# Altium PCB Microphone Breakout Board.PcbDoc (part 2 of 2)
Units mm, origin at the board's own origin, x right, y up, seen from the top; angles counter-clockwise.
Board outline 50 x 68.07 mm, 2 copper layers (Top Layer, Bottom Layer), stack 1.448 mm thick; 111 components, 81 nets, 324 pads, 44 vias.
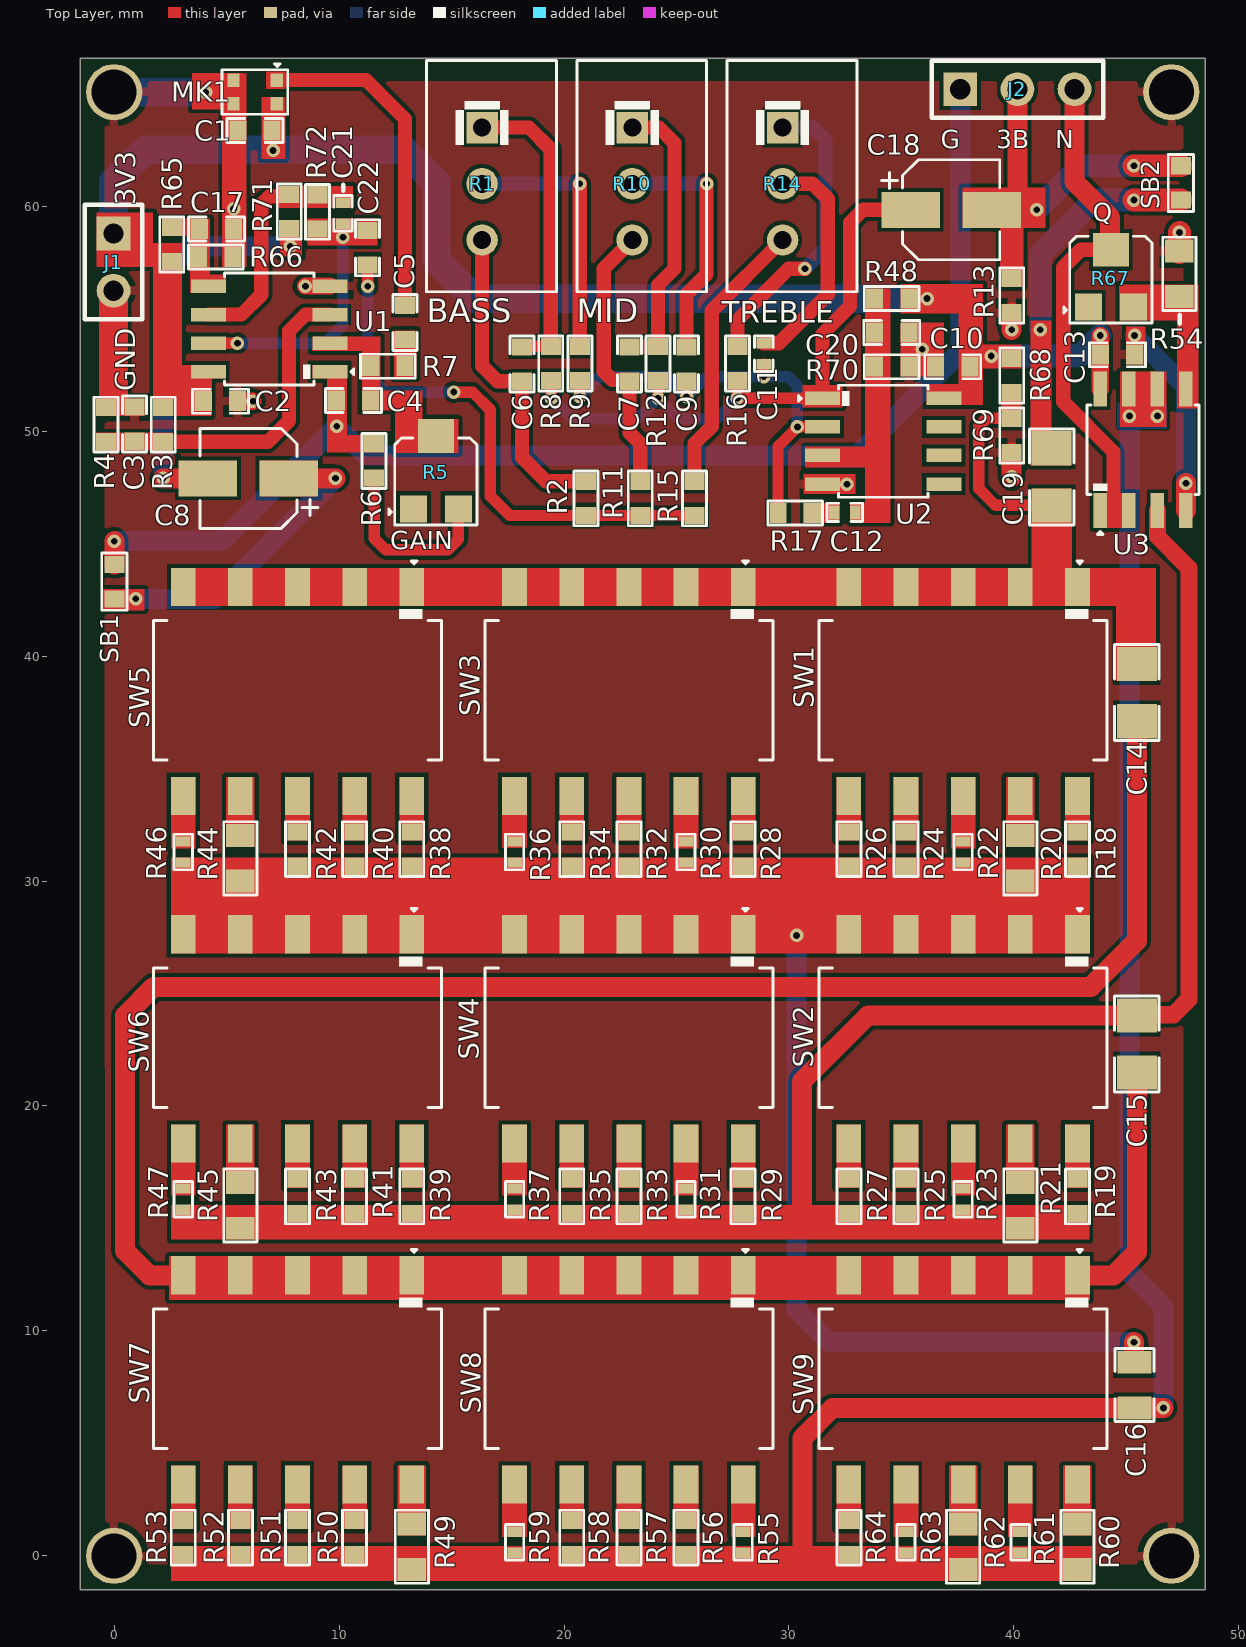
[diagram p0: Top Layer view]

## Part data (continued)
R40 R41: library part RT0603BRD071K1L, "RES SMD 1.1K OHM 0.1% 1/10W 0603", Case Code (Imperial)=0603, Case Code (Metric)=1608, LCSC Part Number=C705736, Manufacturer=Yageo, Max Operating Temperature=125°C, Max Power Dissipation=100mW, Min Operating Temperature=-55°C, Package Quantity=5000, Resistance=1.1kR, Resistor Type="Thin Film", Supplier Part Number 1=1991436, Temperature Coefficient=25ppm/°C, Tolerance=0.1%, Voltage Rating=75V, Voltage Rating (DC)=50V, Case/Package=0603, Category="Chip SMD Resistors", ComponentLink1Description=https://datasheet.ciiva.com/12725/pyu-rt-1-to-0-05-rohs-l-4-12725819.pdf?src-supplier=Mouser, ComponentLink1URL=https://datasheet.ciiva.com/12725/pyu-rt-1-to-0-05-rohs-l-4-12725819.pdf?src-supplier=Mouser, ComponentLink2Description=https://datasheet.ciiva.com/2585/pyu-rt-1-to-0-05-rohs-l-4-2585740.pdf?src-supplier=Digi-Key, ComponentLink2URL=https://datasheet.ciiva.com/2585/pyu-rt-1-to-0-05-rohs-l-4-2585740.pdf?src-supplier=Digi-Key, ComponentLink3Description=https://datasheet.ciiva.com/8895/pyu-rt-1-to-0-05-rohs-l-4-8895949.pdf?src-supplier=Avnet, ComponentLink3URL=https://datasheet.ciiva.com/8895/pyu-rt-1-to-0-05-rohs-l-4-8895949.pdf?src-supplier=Avnet, Contact Plating=Tin,Matte, Features="Moisture Resistant", Height=0.022inch, Item Type=Resistor, Lead Free="Lead Free", Length=0.063inch, Manufacturer Part Number=RT0603BRD071K1L, Number of Terminations=2, Packaging="Tape and Reel", Power Rating=100mW, Pricing 1="10=0.23500, 100=0.21900, 250=0.20400, 500=0.19000, 1000=0.17400 (GBP)", Radiation Hardening=No, RoHS=Yes, RoHS Compliant=Yes, Series=RT, Stock 1=7030, Supplier 1=Rs, Termination=SMD/SMT, Width=0.031inch
R44 R45: library part ARG05BTC9000N, "125mW Thin Film Resistor 150V ±25ppm/℃ ±0.1% -55℃~+155℃ 900Ω 0805 Chip Resistor - Surface Mount ROHS", LCSC Part Number=C2828704, Manufacturer="Viking Tech", ComponentLink1Description=LCSC, ComponentLink1URL=https://www.lcsc.com/product-detail/Chip-Resistor-Surface-Mount_Viking-Tech-ARG05BTC9000N_C2828704.html, Item Type=Resistor, Manufacturer Part Number=ARG05BTC9000N
R46 R47 R59: library part RT0402BRD07806RL, "RES SMD 806 OHM 0.1% 1/16W 0402", Case Code (Imperial)=0402, Case Code (Metric)=1005, LCSC Part Number=C852922, Manufacturer=Yageo, Max Operating Temperature=155°C, Max Power Dissipation=63mW, Min Operating Temperature=-55°C, Package Quantity=10000, Power Rating=62.5mW, Resistor Type="Thin Film", Temperature Coefficient=25ppm/°C, Tolerance=0.1%, Voltage Rating=50V, Case/Package=0402, Category="Chip SMD Resistors", ComponentLink1Description=https://datasheet.ciiva.com/2582/pyu-rt-1-to-0-05-rohs-l-4-2582500.pdf?src-supplier=Digi-Key, ComponentLink1URL=https://datasheet.ciiva.com/2582/pyu-rt-1-to-0-05-rohs-l-4-2582500.pdf?src-supplier=Digi-Key, ComponentLink2Description=https://datasheet.ciiva.com/46635/pyu-rt-1-to-0-05-rohs-l-5-46635068.pdf?src-supplier=Digi-Key, ComponentLink2URL=https://datasheet.ciiva.com/46635/pyu-rt-1-to-0-05-rohs-l-5-46635068.pdf?src-supplier=Digi-Key, Features="Moisture Resistant", Height=0.014inch, Item Type=Resistor, Lead Free="Lead Free", Length=0.039inch, Manufacturer Part Number=RT0402BRD07806RL, Number of Terminations=2, Packaging="Tape and Reel", Pricing 1="1=0.32050, 10=0.28580, 25=0.25690, 100=0.10950 (USD)", Resistance=806R, RoHS=Yes, RoHS Compliant=Yes, Series=RT, Stock 1=104, Supplier 1="Arrow Electronics", Supplier Part Number 1=RT0402BRD07806RL, Termination=SMD/SMT, Voltage Rating (DC)=50V, Width=0.02inch
R51: library part RT0603BRD0713K3L, "RES SMD 13.3KOHM 0.1% 1/10W 0603", Case Code (Imperial)=0603, Case Code (Metric)=1608, LCSC Part Number=C861117, Manufacturer=Yageo, Max Operating Temperature=125°C, Max Power Dissipation=100mW, Min Operating Temperature=-55°C, Package Quantity=5000, Resistance=13.3kR, Resistor Type="Thin Film", Temperature Coefficient=25ppm/°C, Tolerance=0.1%, Voltage Rating=75V, Voltage Rating (DC)=50V, Case/Package=0603, Category="Chip SMD Resistors", ComponentLink1Description=https://datasheet.ciiva.com/12725/pyu-rt-1-to-0-05-rohs-l-4-12725067.pdf?src-supplier=Mouser, ComponentLink1URL=https://datasheet.ciiva.com/12725/pyu-rt-1-to-0-05-rohs-l-4-12725067.pdf?src-supplier=Mouser, ComponentLink2Description=https://datasheet.ciiva.com/8890/pyu-rt-1-to-0-05-rohs-l-4-8890934.pdf?src-supplier=Avnet, ComponentLink2URL=https://datasheet.ciiva.com/8890/pyu-rt-1-to-0-05-rohs-l-4-8890934.pdf?src-supplier=Avnet, ComponentLink3Description=https://datasheet.ciiva.com/2585/pyu-rt-1-to-0-05-rohs-l-4-2585661.pdf?src-supplier=Digi-Key, ComponentLink3URL=https://datasheet.ciiva.com/2585/pyu-rt-1-to-0-05-rohs-l-4-2585661.pdf?src-supplier=Digi-Key, ComponentLink4Description=https://datasheet.ciiva.com/46635/pyu-rt-1-to-0-05-rohs-l-5-46635007.pdf?src-supplier=Digi-Key, ComponentLink4URL=https://datasheet.ciiva.com/46635/pyu-rt-1-to-0-05-rohs-l-5-46635007.pdf?src-supplier=Digi-Key, Construction=Rectangular, Contact Plating=Tin,Matte, Depth=0.8mm, Features="Moisture Resistant", Height=0.022inch, Item Type=Resistor, Lead Free="Lead Free", Length=0.063inch, Manufacturer Part Number=RT0603BRD0713K3L, Military Standard=Not, Number of Terminations=2, Packaging="Tape and Reel", Power Rating=100mW, Pricing 1="1=0.29220, 10=0.24060, 25=0.23820, 100=0.10400, 250=0.10250, 500=0.10060, 1000=0.06040, 3000=0.04000 (USD)", Radiation Hardening=No, RoHS=Yes, RoHS Compliant=Yes, Series=RT, Stock 1=4750, Supplier 1="Arrow Electronics", Supplier Part Number 1=RT0603BRD0713K3L, Termination=SMD/SMT, Width=0.031inch
R54: library part FRC0805F9802TS, "125mW Thick Film Resistors 150V ±100ppm/℃ ±1% -55℃~+155℃ 98kΩ 0805 Chip Resistor - Surface Mount ROHS", LCSC Part Number=C2933514, Manufacturer=FOJAN, ComponentLink1Description=LCSC, ComponentLink1URL=https://www.lcsc.com/product-detail/Chip-Resistor-Surface-Mount_FOJAN-FRC0805F9802TS_C2933514.html, Item Type=Resistor, Manufacturer Part Number=FRC0805F9802TS
R60: library part RT0805BRD07649RL, "RES SMD 649 OHM 0.1% 1/8W 0805", Case Code (Imperial)=0805, Case Code (Metric)=2012, LCSC Part Number=C865602, Manufacturer=Yageo, Max Operating Temperature=125°C, Max Power Dissipation=125mW, Min Operating Temperature=-55°C, Package Quantity=5000, Resistor Type="Thin Film", Supplier Part Number 1=YAG4930CT-ND, Temperature Coefficient=25ppm/°C, Tolerance=0.1%, Voltage Rating=150V, Case/Package=0805, Category="Chip SMD Resistors", ComponentLink1Description=https://datasheet.ciiva.com/2585/pyu-rt-1-to-0-05-rohs-l-5-2585132.pdf?src-supplier=Digi-Key, ComponentLink1URL=https://datasheet.ciiva.com/2585/pyu-rt-1-to-0-05-rohs-l-5-2585132.pdf?src-supplier=Digi-Key, ComponentLink2Description=https://datasheet.ciiva.com/12704/pyu-rt-1-to-0-05-rohs-l-4-12704493.pdf?src-supplier=Mouser, ComponentLink2URL=https://datasheet.ciiva.com/12704/pyu-rt-1-to-0-05-rohs-l-4-12704493.pdf?src-supplier=Mouser, Contact Plating=Tin,Matte, Height=0.024inch, Item Type=Resistor, Lead Free="Lead Free", Length=0.079inch, Manufacturer Part Number=RT0805BRD07649RL, Number of Terminations=2, Packaging="Tape and Reel", Power Rating=125mW, Pricing 1="1=0.38000, 10=0.27200, 100=0.10870, 500=0.07404, 1000=0.05357, 2500=0.04963 (USD)", Radiation Hardening=No, Resistance=649R, RoHS=Yes, RoHS Compliant=Yes, Series=RT, Stock 1=6872, Supplier 1=Digi-Key, Termination=SMD/SMT, Voltage Rating (DC)=150V, Width=0.049inch
R61: library part ARG02BTC5490, "62.5mW Thin Film Resistor 50V ±25ppm/℃ ±0.1% -55℃~+155℃ 549Ω 0402 Chip Resistor - Surface Mount ROHS", LCSC Part Number=C2684524, Manufacturer="Viking Tech", ComponentLink1Description=LCSC, ComponentLink1URL=https://www.lcsc.com/product-detail/Chip-Resistor-Surface-Mount_Viking-Tech-ARG02BTC5490_C2684524.html, Item Type=Resistor, Manufacturer Part Number=ARG02BTC5490
R62: library part ARG05BTC5000, "125mW Thin Film Resistor 150V ±25ppm/℃ ±0.1% -55℃~+155℃ 500Ω 0805 Chip Resistor - Surface Mount ROHS", LCSC Part Number=C2828711, Manufacturer="Viking Tech", ComponentLink1Description=LCSC, ComponentLink1URL=https://www.lcsc.com/product-detail/Chip-Resistor-Surface-Mount_Viking-Tech-ARG05BTC5000_C2828711.html, Item Type=Resistor, Manufacturer Part Number=ARG05BTC5000
R63: library part RT0402BRD07453RL, "RES SMD 453 OHM 0.1% 1/16W 0402", Case Code (Imperial)=0402, Case Code (Metric)=1005, LCSC Part Number=C852794, Manufacturer=Yageo, Max Operating Temperature=125°C, Min Operating Temperature=-55°C, Power Rating=62.5mW, Supplier Part Number 1=YAG4266CT-ND, Temperature Coefficient=25ppm/°C, Tolerance=0.1%, Voltage Rating=50V, Case/Package=0402, Category="Chip SMD Resistors", ComponentLink1Description=http://www.mouser.com/ds/2/447/yageodocoutput-1125656.pdf?src-supplier=Mouser, ComponentLink1URL=http://www.mouser.com/ds/2/447/yageodocoutput-1125656.pdf?src-supplier=Mouser, ComponentLink2Description=http://www.yageo.com/documents/recent/PYu-RT_1-to-0.01_RoHS_L_9.pdf?src-supplier=Digi-Key, ComponentLink2URL=http://www.yageo.com/documents/recent/PYu-RT_1-to-0.01_RoHS_L_9.pdf?src-supplier=Digi-Key, Height=350um, Item Type=Resistor, Lead Free="Lead Free", Length=1mm, Manufacturer Part Number=RT0402BRD07453RL, Packaging="Tape and Reel", Pricing 1="1=0.40000, 10=0.33600, 100=0.13130, 500=0.07938, 1000=0.05496, 2500=0.05038, 5000=0.04580 (USD)", Resistance=453R, RoHS=Yes, RoHS Compliant=Yes, Series=RT, Stock 1=59576, Supplier 1=Digi-Key, Termination=SMD/SMT, Voltage Rating (DC)=50V, Width=500um
R64: library part ARG03BTC4020, "100mW Thin Film Resistor 75V ±25ppm/℃ ±0.1% -55℃~+155℃ 402Ω 0603 Chip Resistor - Surface Mount ROHS", LCSC Part Number=C2683044, Manufacturer="Viking Tech", ComponentLink1Description=LCSC, ComponentLink1URL=https://www.lcsc.com/product-detail/Chip-Resistor-Surface-Mount_Viking-Tech-ARG03BTC4020_C2683044.html, Item Type=Resistor, Manufacturer Part Number=ARG03BTC4020
R67: library part TC33X-2-104E, "TRIMMER 100K OHM 0.1W J LEAD TOP", Color=Silver, LCSC Part Number=C719186, Manufacturer=Bourns, Max Operating Temperature=100°C, Max Power Dissipation=100mW, Min Operating Temperature=-40°C, Package Quantity=2500, Resistance=100kR, Resistance Tolerance=25%, Resistor Type=Carbon,Cermet, Temperature Coefficient=250ppm/°C, Voltage Rating (DC)=50V, Category="Variable Resistors and Potentiometers", ComponentLink1Description=https://datasheet.ciiva.com/11832/0900766b802749b3-11832506.pdf?src-supplier=RSComponents, ComponentLink1URL=https://datasheet.ciiva.com/11832/0900766b802749b3-11832506.pdf?src-supplier=RSComponents, ComponentLink2Description=https://datasheet.ciiva.com/8700/tc33-8700395.pdf?src-supplier=Avnet, ComponentLink2URL=https://datasheet.ciiva.com/8700/tc33-8700395.pdf?src-supplier=Avnet, ComponentLink3Description=https://datasheet.ciiva.com/2155/tc33-2155965.pdf?src-supplier=Digi-Key, ComponentLink3URL=https://datasheet.ciiva.com/2155/tc33-2155965.pdf?src-supplier=Digi-Key, ComponentLink4Description=https://datasheet.ciiva.com/7953/1818686-7953181.pdf?src-supplier=Element14, ComponentLink4URL=https://datasheet.ciiva.com/7953/1818686-7953181.pdf?src-supplier=Element14, ComponentLink5Description=https://datasheet.ciiva.com/16716/70155234-16716301.pdf?src-supplier=Allied+Electronics, ComponentLink5URL=https://datasheet.ciiva.com/16716/70155234-16716301.pdf?src-supplier=Allied+Electronics, ComponentLink6Description=https://datasheet.ciiva.com/2155/tc33-2155966.pdf?src-supplier=Digi-Key, ComponentLink6URL=https://datasheet.ciiva.com/2155/tc33-2155966.pdf?src-supplier=Digi-Key, ComponentLink7Description=https://datasheet.ciiva.com/7953/1818686-7953182.pdf?src-supplier=Element14, ComponentLink7URL=https://datasheet.ciiva.com/7953/1818686-7953182.pdf?src-supplier=Element14, ComponentLink8Description=https://datasheet.ciiva.com/2155/tc33-2155967.pdf?src-supplier=Digi-Key, ComponentLink8URL=https://datasheet.ciiva.com/2155/tc33-2155967.pdf?src-supplier=Digi-Key, Depth=3.8mm, Height=0.047inch, Item Type=Trimmer, Length=3mm, Manufacturer Part Number=TC33X-2-104E, Military Standard=Not, Mount="Surface Mount", Number of Turns=1, Packaging="Tape and Reel", Power Rating=100mW, Pricing 1="2500=0.15500, 5000=0.13130 (USD)", Radiation Hardening=No, REACH SVHC="No SVHC", RoHS=Yes, RoHS Compliant=Yes, Series=TC33, Stock 1=12500, Supplier 1="Arrow Electronics", Supplier Part Number 1=TC33X-2-104E, Termination="Foot Print", Tolerance=25%, Weight=29.4mg, Width=0.118inch
R71 R72: library part RT0603BRD0747KL, "RES SMD 47K OHM 0.1% 1/10W 0603", Case Code (Imperial)=0603, Case Code (Metric)=1608, LCSC Part Number=C326725, Manufacturer=Yageo, Max Operating Temperature=125°C, Max Power Dissipation=100mW, Min Operating Temperature=-55°C, Package Quantity=5000, Resistance=47kR, Resistor Type="Thin Film", Temperature Coefficient=25ppm/°C, Voltage Rating=75V, Voltage Rating (DC)=50V, Case/Package=0603, Category="Chip SMD Resistors", ComponentLink1Description=https://datasheet.ciiva.com/2585/pyu-rt-1-to-0-05-rohs-l-4-2585964.pdf?src-supplier=Digi-Key, ComponentLink1URL=https://datasheet.ciiva.com/2585/pyu-rt-1-to-0-05-rohs-l-4-2585964.pdf?src-supplier=Digi-Key, ComponentLink2Description=https://datasheet.ciiva.com/46635/pyu-rt-1-to-0-05-rohs-l-5-46635309.pdf?src-supplier=Digi-Key, ComponentLink2URL=https://datasheet.ciiva.com/46635/pyu-rt-1-to-0-05-rohs-l-5-46635309.pdf?src-supplier=Digi-Key, Construction=Rectangular, Contact Plating=Tin,Lead, Depth=0.8mm, Features="Moisture Resistant", Height=0.022inch, Item Type=Resistor, Lead Free="Lead Free", Length=0.063inch, Manufacturer Part Number=RT0603BRD0747KL, Military Standard=Not, Number of Terminations=2, Packaging="Tape and Reel", Power Rating=100mW, Pricing 1="1=0.29190, 10=0.22910, 25=0.22680, 100=0.09530, 250=0.09440, 500=0.09340, 1000=0.04780, 3000=0.03070 (USD)", RoHS=Yes, RoHS Compliant=Yes, Series=RT, Stock 1=5153, Supplier 1="Arrow Electronics", Supplier Part Number 1=RT0603BRD0747KL, Termination=SMD/SMT, Width=0.031inch
SB1 SB2: "Solder Bridge ON", Item Type="Solder Bridge", Manufacturer Part Number="Solder Bridge"
SW1 SW2 SW3 SW4 SW5 SW6 SW7 SW8 SW9: "Gull Wing SPST 24V 25mA Black -20℃~+70℃ 3000 Flat dial, raised type 2.54mm 5 SMD-10P,6x12.6mm DIP Switches ROHS", LCSC Part Number=C319036, Manufacturer="XKB Connectivity", ComponentLink1Description=LCSC, ComponentLink1URL=https://www.lcsc.com/product-detail/DIP-Switches_XKB-Connectivity-DSIC05LS-P_C319036.html, Item Type=Switch, Manufacturer Part Number=DSIC05LS-P
U1 U2 U3: "General Purpose Amplifier 2 Circuit  8-SO", Case/Package=SOIC, Dual Supply Voltage=9V, Input Bias Current=150nA, Input Offset Voltage (Vos)=7mV, LCSC Part Number=C105411, Manufacturer=STMicroelectronics, Max Dual Supply Voltage=15V, Max Operating Temperature=125°C, Max Supply Current=32mA, Max Supply Voltage=30V, Min Dual Supply Voltage=1.5V, Min Operating Temperature=-40°C, Min Supply Voltage=3V, Nominal Supply Current=1.2mA, Operating Supply Current=700uA, Output Current=40mA, Package Body Material=Plastic, Package Quantity=2500, Package Shape=Rectangular, Peak Reflow Temperature (Cel)=260°C, Supplier Part Number 1=511-LM2904DT, Temperature Grade=AUTOMOTIVE, Time @ Peak Reflow Temperature-Max (s)=40s, Voltage Gain=100dB, Amplifier Type="GENERAL PURPOSE", Bandwidth=1.1MHz, Category="Amplifiers - Op Amps, Buffer, Instrumentation", Common Mode Rejection Ratio=70dB, ComponentLink1Description=https://datasheet.ciiva.com/5703/1802155-5703335.pdf?src-supplier=Farnell, ComponentLink1URL=https://datasheet.ciiva.com/5703/1802155-5703335.pdf?src-supplier=Farnell, ComponentLink2Description=https://datasheet.ciiva.com/27055/1993227-27055857.pdf?src-supplier=Jameco, ComponentLink2URL=https://datasheet.ciiva.com/27055/1993227-27055857.pdf?src-supplier=Jameco, ComponentLink3Description=https://datasheet.ciiva.com/15129/getdatasheetpartid-32489-15129656.pdf?src-supplier=Verical, ComponentLink3URL=https://datasheet.ciiva.com/15129/getdatasheetpartid-32489-15129656.pdf?src-supplier=Verical, ComponentLink4Description=https://datasheet.ciiva.com/41459/001185000-da-01-en-ic-op-amp-low-pwr-du-lm2904dt-soic-8-stm-41459659.pdf?src-supplier=Conrad, ComponentLink4URL=https://datasheet.ciiva.com/41459/001185000-da-01-en-ic-op-amp-low-pwr-du-lm2904dt-soic-8-stm-41459659.pdf?src-supplier=Conrad, ComponentLink5Description=https://datasheet.ciiva.com/1795/cd00000535-1795476.pdf?src-supplier=Digi-Key, ComponentLink5URL=https://datasheet.ciiva.com/1795/cd00000535-1795476.pdf?src-supplier=Digi-Key, ComponentLink6Description=https://datasheet.ciiva.com/1795/cd00000535-1795475.pdf?src-supplier=Digi-Key, ComponentLink6URL=https://datasheet.ciiva.com/1795/cd00000535-1795475.pdf?src-supplier=Digi-Key, ComponentLink7Description=https://datasheet.ciiva.com/1795/cd00000535-1795477.pdf?src-supplier=Digi-Key, ComponentLink7URL=https://datasheet.ciiva.com/1795/cd00000535-1795477.pdf?src-supplier=Digi-Key, ComponentLink8Description=https://datasheet.ciiva.com/16200/cd00000535-16200605.pdf?src-supplier=Future+Electronics, ComponentLink8URL=https://datasheet.ciiva.com/16200/cd00000535-16200605.pdf?src-supplier=Future+Electronics, Contact Plating=Gold, Gain Bandwidth Product=1.1MHz, Height=1.25mm, Input Offset Voltage-Max=7mV, Item Type=IC, JESD-30 Code=R-PDSO-G8, Lead Free="Contains Lead", Length=4.9mm, Manufacturer Part Number=LM2904DT, Moisture Sensitivity Level=1, Mount="Surface Mount", Number of Amplifiers=2, Number of Channels=2, Number of Circuits=2, Number of Elements=2, Number of Functions=2, Number of Pins=8, Number of Terminals/Pins=8, Operating Supply Voltage=15V, Output Current per Channel=40mA, Packaging="Tape and Reel", Pricing 1="1=0.44000, 10=0.34900, 50=0.34900, 100=0.25900, 1000=0.17000, 10000=0.15000 (USD)", Radiation Hardening=No, Reach SVHC Compliant=Yes, RoHS=Yes, RoHS Compliant=Yes, Series=-, Slew Rate=0.6V/µs, Slew Rate-Nom=0.6V/µs, Stock 1=104539, Supplier 1=Mouser, Supply Current=1.2mA, Surface Mount=Yes, Technology=BIPOLAR, Terminal Finish=Nickel, Terminal Form="Gull Wing", Terminal Position=DUAL, Unity Gain Bandwidth Product=1.1MHz, Weight=0.01lb, Width=3.9mm

## Free pads (board coordinates)
  round 2.5 hole 2 mask+0.05: MH(0,0) MH(0,65.072) MH(47,0) MH(47,65.072)

## Via types
v1: diameter 0.6, hole 0.3, Top Layer to Bottom Layer, tented both sides, 44 vias

## Nets (pads, with @x,y where several pads share a name; then routed paths per layer and width w, separated by ;. In a path a pad name is that pad's centre, name@x,y a point inside that pad or via, vN(x,y) a via of type N, cw(c..) or ccw(c..) an arc to the next point about the centre after c; other vN are vias at no path point)
1/2VCC: C3.2 R3.1 R4.1 U1.3 | length 12.1
  Top Layer w0.635: R3.1 6.835,49.529 7.771,50.465 7.771,54.45 8.503,55.182 U1.3
1/2VCC(2): C17.2 R65.1 R66.1 U1.5
1/2VCC(3): C12.2 C20.2 R48.1 R70.1 U2.3
3BAND_IN: C21.1 R71.1 R72.2 U1.6 | length 8.2
  Top Layer w0.635: U1.6 5.657,55.182 6.542,56.067 6.542,60.076 6.914,60.448 7.756,60.448 R71.1@7.82,60.512
3BAND_IN*: C22.2 R2.2 R11.2 R15.2 | length 24.2
  Top Layer w0.508: v1(11.269,56.446) C22.2 ; v1(15.099,51.738) 15.935,51.738 16.721,50.953 16.721,47.113 17.583,46.252 R2.2 R11.2 R15.2
  Bottom Layer w0.508: v1(11.269,56.446) 11.269,52.553 12.084,51.738 v1(15.099,51.738)
3BAND_OUT: C19.1 SB2.2 | length 10.6
  Top Layer w1.016: v1(45.339,60.274) SB2.2
  Bottom Layer w1.016: v1@41.172,54.532 41.172,57.895 43.551,60.274 v1(45.339,60.274)
  other v1: 41.172,54.507
3BAND_OUT#: C18.2 J2.2 R13.1 SB2.1 | length 14.8
  Top Layer w0.762: C18.2@39.145,59.417 C18.2@39.665,59.936 ; 39.904,58.527 C18.2@39.904,59.935
  Top Layer w0.889: C18.2@39.665,59.936 39.665,59.993 40.156,60.484 J2.2
  Top Layer w1.016: v1(45.339,61.798) SB2.1
  Bottom Layer w1.016: v1(41.021,59.841) 42.978,61.798 v1(45.339,61.798)
3BAND_OUT*: C14.1 C19.2 R68.1 R69.1 SW1.1 SW1.2 SW1.3 SW1.4 SW1.5 SW3.1 SW3.2 SW3.3 SW3.4 SW3.5 SW5.1 SW5.2 SW5.3 SW5.4 SW5.5 | length 7.9
  Top Layer w0.508: R69.1 38.794,50.57 38.444,50.22 38.444,47.436 39.181,46.699 C19.2
FEEDBACK: C18.1 R8.1 R12.1 R16.1 U2.1 | length 27.2
  Top Layer w0.508: v1(19.437,51.459) R8.1@19.437,52.246 ; v1(24.179,51.459) R12.1 ; R16.1 v1(27.71,51.459) U2.1 ; v1@27.713,51.46 v1@27.713,51.501
  Top Layer w0.635: U2.1 31.487,54.323 32.713,55.549 32.713,59.261 33.294,59.841 C18.1
  Bottom Layer w0.508: v1(19.437,51.459) 20.35,50.546 23.266,50.546 v1(24.179,51.459) 25.092,50.546 26.797,50.546 v1(27.71,51.459)
GAIN_OUT: C8.1 SB1.2 | length 13.3
  Top Layer w0.508: v1@0.864,42.469 0.889,42.469 v1@0.94,42.52
  Top Layer w0.889: C8.1 v1(9.837,47.903)
  Bottom Layer w0.889: v1(0.965,42.545) 4.479,42.545 v1(9.837,47.903)
GAIN_OUT#: C4.2 J2.1 R6.1 SB1.1 U1.1 | length 54.9
  Top Layer w0.889: SB1.1 v1(0.01,45.11)
  Bottom Layer w0.889: v1(0.01,45.11) 4.788,45.11 v1(9.892,50.215) 11.188,48.919 33.008,48.919 37.616,53.527 J2.1
GND: C1.2 C2.2 C3.1 C10.2 C13.2 C17.1 C20.1 J1.2 MK1.2 MK1.3 pad.MH R4.2 R13.2 R54.2 R66.2 R69.2 R70.2 U1.4 U2.4 U3.4 | length 24.3
  Top Layer w0.508: C17.1@5.295,59 C17.1 v1@5.307,59.73 ; C2.2 C2.2@5.486,51.331 ; v1(6.172,51.329) v1(6.172,51.329) ; v1(8.503,56.446) v1@8.506,56.449 ; U1.4@9.59,56.449 U1.4 ; U2.4 U2.4@31.491,47.645 ; C13.2 v1(45.363,54.253)
  Top Layer w0.762: C2.2@5.486,51.331 v1(6.172,51.329) ; v1@8.506,56.449 U1.4@9.59,56.449 ; pad.MH@47,65.072 pad.MH@47.357,64.715
  Top Layer w0.889: v1(39.902,47.969) R69.2 ; v1(39.902,54.507) R13.2 ; U3.4 v1(47.649,47.687)
  Top Layer w1.016: R54.2@47.361,57.94 v1(47.361,58.835)
  Top Layer w1.27: R4.2@-0.027,51.383 J1.2
  Bottom Layer w0.889: v1(45.363,54.253) 47.649,51.967 v1(47.649,47.687)
  Bottom Layer w1.27: pad.MH@0,65.072 v1(4.063,65.072)
  other v1: 32.579,47.645 35.929,53.638 5.307,59.882
MIC_OUT: C5.1 MK1.1 | length 14.7
  Top Layer w0.635: MK1.1@7.239,65.608 11.201,65.608 12.929,63.881 C5.1
MID1: C16.1 R18.1 R20.1 R22.1 R24.1 R26.1 R28.1 R30.1 R32.1 R34.1 R36.1 R38.1 R40.1 R42.1 R44.1 R46.1 SW2.1 SW2.2 SW2.3 SW2.4 SW2.5 SW4.1 SW4.2 SW4.3 SW4.4 SW4.5 SW6.1 SW6.2 SW6.3 SW6.4 SW6.5 | length 33.1
  Top Layer w0.889: C16.1@45.338,8.609 v1(45.338,9.498)
  Bottom Layer w0.889: v1(30.339,27.583) 30.339,10.946 31.787,9.498 v1(45.338,9.498)
MID2: C14.2 C15.1 SW7.1 SW7.2 SW7.3 SW7.4 SW7.5 SW8.1 SW8.2 SW8.3 SW8.4 SW8.5 SW9.1 SW9.2 SW9.3 SW9.4 SW9.5 | length 80.7
  Top Layer w0.889: SW7.5 1.576,12.47 0.494,13.552 0.494,24.027 1.764,25.297 43.42,25.297 45.465,27.342 C14.2 ; SW9.1 44.436,12.47 45.465,13.499 C15.1
NetC4_1: C4.1 R5.2 R7.1 U1.2
NetC5_2: C5.2 R7.2
NetC6_1: C6.1 R1.3 R2.1 | length 14.3
  Top Layer w0.635: R1.3 16.356,52.906 17.041,52.221 C6.1 18.134,48.837 19.195,47.776 R2.1
NetC6_2: C6.2 R1.1 R8.2 | length 13.6
  Top Layer w0.508: C6.2@18.033,53.77 R8.2
  Top Layer w0.635: R1.1 18.442,63.499 19.411,62.529 R8.2
NetC7_1: C7.1 R10.1 R12.2 | length 12.7
  Top Layer w0.508: C7.1 C7.1@22.922,53.758
  Top Layer w0.635: C7.1@22.922,53.758 R12.2@24.141,53.758 ; R10.1 24.219,63.499 24.916,62.802 24.916,57.23 24.179,56.493 R12.2
NetC7_2: C7.2 R10.3 R11.1 | length 12.3
  Top Layer w0.635: R10.3 21.768,57.23 21.768,52.656 22.14,52.285 22.845,52.285 C7.2 22.909,49.932 23.392,49.448 R11.1
NetC8_2: C8.2 R71.2 | length 17.2
  Top Layer w0.889: v1(2.183,47.903) C8.2
  Bottom Layer w0.889: v1(2.183,47.903) 2.183,56.981 3.415,58.213 v1(7.835,58.213)
NetC9_1: C9.1 R10.2 | length 10.9
  Top Layer w0.635: C9.1 25.449,56.09 26.338,56.979 v1(26.338,60.999)
  Bottom Layer w0.635: R10.2 v1(26.338,60.999)
NetC11_1: C11.1 R14.2 | length 10.3
  Top Layer w0.508: R14.2@29.714,61.021 R14.2@29.717,61.024
  Top Layer w0.635: C11.1 29.56,53.91 31.722,56.072 31.722,60.331 31.052,61.001 R14.2@29.719,61.001
NetC12_1: C12.1 R17.1
NetC15_2: C15.2 R19.1 R21.1 R23.1 R25.1 R27.1 R29.1 R31.1 R33.1 R35.1 R37.1 R39.1 R41.1 R43.1 R45.1 R47.1 U3.3 | length 47.2
  Top Layer w0.762: R27.1@32.556,15.115 R27.1@32.81,14.862 ; C15.2@45.617,24.027 45.644,24.054 47.092,24.054 47.777,24.74 47.777,43.919 46.379,45.317 U3.3
  Top Layer w0.889: 30.582,15.222 30.582,21.095 33.514,24.027 C15.2@45.617,24.027
NetC16_2: C16.2 R49.1 R50.1 R51.1 R52.1 R53.1 R55.1 R56.1 R57.1 R58.1 R59.1 R60.1 R61.1 R62.1 R63.1 R64.1 U3.6 U3.7 | length 70
  Top Layer w0.762: 30.593,0.049 R64.1
  Top Layer w0.889: 30.593,0.049 30.593,5.231 31.939,6.577 45.287,6.577 v1(46.646,6.577)
  Bottom Layer w0.889: v1@45.109,50.697 45.744,50.697 v1@46.379,50.697 ; v1@45.332,50.672 v1(45.134,50.672) 45.134,12.6 46.646,11.088 v1(46.646,6.577)
  other v1: 46.379,50.672
NetC21_2: C21.2 C22.1 R72.1 U1.7 | length 10.3
  Top Layer w0.508: U1.7 v1(5.484,53.912)
  Top Layer w0.635: C22.1 C22.1@11.317,58.963
  Bottom Layer w0.508: v1(5.484,53.912) 9.35,53.912 10.17,54.732 v1(10.17,58.622)
NetR1_2: R1.2 R9.2 | length 11.6
  Top Layer w0.635: R9.2 v1(20.704,60.999)
  Bottom Layer w0.635: R1.2 v1(20.704,60.999)
NetR5_3: R5.3 R6.2 | length 8.2
  Top Layer w0.508: R6.2 11.559,45.236 12.066,44.728 14.835,44.728 15.299,45.192 R5.3
NetR14_1: R14.1 R16.2 | length 13.4
  Top Layer w0.635: R16.2 27.71,54.943 29.984,57.217 v1(30.713,57.217)
  Bottom Layer w0.635: R14.1 31.066,63.499 31.624,62.941 31.624,58.128 v1(30.713,57.217)
NetR14_3: R14.3 R15.1 | length 12.3
  Top Layer w0.635: R15.1 25.805,49.448 26.567,50.21 26.567,55.349 R14.3
NetR18_2: R18.2 SW1.10
NetR19_2: R19.2 SW2.10
NetR20_2: R20.2 SW1.9
NetR21_2: R21.2 SW2.9
NetR22_2: R22.2 SW1.8
NetR23_2: R23.2 SW2.8
NetR24_2: R24.2 SW1.7
NetR25_2: R25.2 SW2.7
NetR26_2: R26.2 SW1.6
NetR27_2: R27.2 SW2.6
NetR28_2: R28.2 SW3.10
NetR29_2: R29.2 SW4.10
NetR30_2: R30.2 SW3.9
NetR31_2: R31.2 SW4.9
NetR32_2: R32.2 SW3.8
NetR33_2: R33.2 SW4.8
NetR34_2: R34.2 SW3.7
NetR35_2: R35.2 SW4.7
NetR36_2: R36.2 SW3.6
NetR37_2: R37.2 SW4.6
NetR38_2: R38.2 SW5.10
NetR39_2: R39.2 SW6.10
NetR40_2: R40.2 SW5.9
NetR41_2: R41.2 SW6.9
NetR42_2: R42.2 SW5.8
NetR43_2: R43.2 SW6.8
NetR44_2: R44.2 SW5.7
NetR45_2: R45.2 SW6.7
NetR46_2: R46.2 SW5.6
NetR47_2: R47.2 SW6.6
NetR49_2: R49.2 SW7.10
NetR50_2: R50.2 SW7.9
NetR51_2: R51.2 SW7.8
NetR52_2: R52.2 SW7.7
NetR53_2: R53.2 SW7.6
NetR54_1: R54.1 R67.3 U3.5
NetR55_2: R55.2 SW8.10
NetR56_2: R56.2 SW8.9
NetR57_2: R57.2 SW8.8
NetR58_2: R58.2 SW8.7
NetR59_2: R59.2 SW8.6
NetR60_2: R60.2 SW9.10
NetR61_2: R61.2 SW9.9
NetR62_2: R62.2 SW9.8
NetR63_2: R63.2 SW9.7
NetR64_2: R64.2 SW9.6
NOTCH_OUT: J2.3 R67.2 U3.1 U3.2 | length 21.8
  Top Layer w0.635: R67.2 42.972,58.063 42.192,57.283 42.192,51.305 44.425,49.072 44.425,46.699
  Top Layer w0.762: R67.2@44.274,58.098 R67.2
  Top Layer w0.889: J2.3 42.696,61.087 44.274,59.51 R67.2@44.274,58.098
OPAMP_IN: C9.2 C11.2 R9.1 R17.2 U2.2 | length 19.9
  Top Layer w0.508: v1(20.704,51.535) R9.1 ; v1(25.449,51.535) C9.2 ; v1(28.877,52.421) C11.2 ; R17.2@29.511,46.468 29.511,49.323 v1(30.377,50.189) U2.2
  Bottom Layer w0.508: v1(20.704,51.535) 21.589,52.421 24.563,52.421 v1(25.449,51.535) 26.335,52.421 29.97,52.421 30.377,52.014 v1(30.377,50.189)
VCC: C1.1 C2.1 C10.1 C13.1 J1.1 MK1.4 R3.2 R48.2 R65.2 R68.2 U1.8 U2.8 U3.8 | length 51.4
  Top Layer w0.762: U3.8 C13.1 v1(43.839,54.253)
  Bottom Layer w1.016: v1(38.989,53.34) 38.99,53.339 42.925,53.339 v1(43.839,54.253)
  Bottom Layer w1.27: J1.1 -0.027,61.111 1.371,62.508 12.878,62.508 14.326,61.06 14.326,57.599 16.03,55.895 v1(36.139,55.895)
  other v1: 7.064,62.483
pads on no net: R5.1 R67.1 U2.5 U2.6 U2.7

## Polygon pours and split planes (outlines as drawn)
GND on Bottom Layer "GND_L02_P003" (solid, remove dead copper, pour order 3): -0.407,65.747 -0.406,-0.182 47.523,-0.182 47.523,65.747
GND on Top Layer "GND_L01_P002" (solid, remove dead copper, pour order 2): -0.407,65.556 -0.406,-0.372 47.523,-0.372 47.523,65.556

## Other copper
Top Layer:
  region net MIC_OUT: 7.62,65.989 6.762,65.989 6.762,65.202 7.62,65.202
  region net NetC5_2: 13.437,52.375 13.437,54.483 12.446,54.483 12.446,52.375
  rectangle net GND: 30.652,47.201 32.951,48.09
  rectangle net FEEDBACK: 30.61,51.057 32.379,52.043
  rectangle net NetR36_2: 17.254,31.46 18.354,34.631
  rectangle net NetR30_2: 24.874,31.457 25.974,34.627
  rectangle net NetR22_2: 37.193,31.457 38.293,34.627
  rectangle net NetR46_2: 2.522,31.457 3.622,34.627
  rectangle net NetR47_2: 2.522,16.015 3.622,19.186
  rectangle net NetR37_2: 17.254,16.015 18.354,19.186
  rectangle net NetR31_2: 24.874,16.015 25.974,19.186
  rectangle net NetR23_2: 37.193,16.015 38.293,19.186
  rectangle net NetR61_2: 39.733,0.85 40.833,4.02
  rectangle net NetR63_2: 34.653,0.85 35.753,4.02
  rectangle net NetR55_2: 27.414,0.85 28.514,4.02
  rectangle net 3BAND_IN: 7.25,59.929 10.628,60.908
  rectangle net NetC21_2: 8.596,58.263 11.714,59.452
  rectangle net GND: 3.454,64.305 5.725,65.913
  rectangle net 1/2VCC(2): 3.377,56.152 4.266,59.46
  rectangle net NetC16_2: 44.713,50.189 46.775,52.648
  rectangle net NetC16_2: 2.539,-1.119 43.479,0.43
  rectangle net NetC8_2: 7.365,57.757 8.343,59.384
  rectangle net 3BAND_OUT#: 39.372,56.412 40.435,60.641
  rectangle net GND: 44.982,52.956 45.846,54.661
  rectangle net 1/2VCC(2): 2.12,58.683 4.164,59.46
  rectangle net VCC: 1.739,50.672 3.009,57.921
  rectangle net VCC: -0.777,57.299 3.009,58.355
  rectangle net VCC: 0.723,57.516 1.739,59.73
  rectangle net GND: -0.801,50.672 1.358,51.459
  rectangle net VCC: -0.777,57.516 1.739,59.73
  rectangle net GND: 34.949,52.421 36.901,54.825
  rectangle net GND: 4.801,57.299 5.882,65.904
  rectangle net VCC: 6.542,62.102 7.615,64.854
  rectangle net 3BAND_OUT#: 37.713,59.041 41.402,60.832
  rectangle net VCC: 34.949,55.234 38.632,56.533
  rectangle net VCC: 37.534,51.159 38.632,56.428
  rectangle net VCC: 37.663,52.794 40.347,53.845
  rectangle net NetC4_1: 12.479,49.04 13.702,51.814
  rectangle net NetC4_1: 11.018,50.925 13.702,51.814
  rectangle net VCC: 1.739,50.672 4.342,52.942
  rectangle net NetR54_1: 47.244,51.003 48.209,56.412
  rectangle net NetR54_1: 44.679,54.913 48.209,56.515
  rectangle net 3BAND_OUT*: 44.55,38.886 46.328,43.927
  rectangle net NOTCH_OUT: 43.539,45.698 45.409,47.248
  rectangle net 3BAND_OUT: 40.728,48.477 41.681,54.913
  rectangle net 3BAND_OUT: 40.791,48.477 42.569,50.001
  rectangle net GAIN_OUT#: 9.463,49.059 12.003,49.821
  rectangle net NetC12_1: 30.654,45.922 32.239,46.811
  rectangle net 3BAND_OUT*: 40.791,42.227 42.581,47.461
  rectangle net 3BAND_OUT*: 39.458,50.189 40.347,52.094
  rectangle net VCC: 36.112,51.159 38.425,52.094
  rectangle net 1/2VCC(3): 32.722,45.922 34.517,46.805
  rectangle net 1/2VCC(3): 30.712,48.387 33.933,49.323
  rectangle net 1/2VCC(3): 33.374,46.056 34.517,56.339
  region net NetR60_2: 43.458,4.02 42.188,4.02 42.188,0.913 43.458,0.913
  region net NetR62_2: 38.378,4.02 37.108,4.02 37.108,0.913 38.378,0.913
  rectangle net NetR64_2: 32.113,1.192 33.213,4.02
  rectangle net NetR56_2: 24.874,1.192 25.974,4.02
  rectangle net NetR57_2: 22.334,1.192 23.434,4.02
  rectangle net NetR58_2: 19.794,1.192 20.894,4.02
  rectangle net NetR59_2: 17.254,0.85 18.354,4.02
  region net NetR49_2: 13.867,4.02 12.597,4.02 12.597,0.913 13.867,0.913
  rectangle net NetR50_2: 10.142,1.192 11.242,4.02
  rectangle net NetR51_2: 7.602,1.192 8.702,4.02
  rectangle net NetR52_2: 5.062,1.192 6.162,4.02
  rectangle net NetR53_2: 2.522,1.192 3.622,4.02
  rectangle net NetR19_2: 42.273,16.358 43.373,19.186
  region net NetR21_2: 40.918,19.186 39.648,19.186 39.648,16.086 40.918,16.086
  rectangle net NetR25_2: 34.653,16.358 35.753,19.186
  rectangle net NetR27_2: 32.113,16.358 33.213,19.186
  rectangle net NetR29_2: 27.414,16.358 28.514,19.186
  rectangle net NetR33_2: 22.334,16.358 23.434,19.186
  rectangle net NetR35_2: 19.794,16.358 20.894,19.186
  region net NetR45_2: 6.247,19.186 4.977,19.186 4.977,16.086 6.247,16.086
  rectangle net NetR43_2: 7.602,16.358 8.702,19.186
  rectangle net NetR39_2: 12.682,16.358 13.782,19.186
  rectangle net NetR41_2: 10.142,16.358 11.242,19.186
  rectangle net NetC15_2: 27.52,14.248 28.409,15.603
  rectangle net NetC15_2: 42.379,14.054 43.268,15.603
  rectangle net NetC15_2: 2.522,14.054 43.356,15.603
  rectangle net NetR44_2: 4.977,31.52 6.247,34.627
  rectangle net NetR42_2: 7.602,31.799 8.702,34.627
  rectangle net NetR40_2: 10.142,31.799 11.242,34.627
  rectangle net NetR38_2: 12.682,31.799 13.782,34.627
  rectangle net NetR34_2: 19.794,31.799 20.894,34.627
  rectangle net NetR32_2: 22.334,31.799 23.434,34.627
  rectangle net NetR28_2: 27.414,31.799 28.514,34.627
  rectangle net NetR18_2: 42.273,31.799 43.373,34.627
  rectangle net NetR20_2: 39.648,31.52 40.918,34.627
  rectangle net NetR24_2: 34.653,31.799 35.753,34.627
  rectangle net NetR26_2: 32.113,31.799 33.213,34.627
  rectangle net MID2: 2.437,11.379 43.373,13.32
  rectangle net MID1: 2.522,26.786 43.373,31.037
  rectangle net 3BAND_OUT*: 2.522,42.227 46.328,43.927
  rectangle net GND: 4.901,57.299 5.688,59.432
  rectangle net NetC4_1: 12.479,49.04 15.302,50.54
  rectangle net NetC4_1: 11.018,50.925 11.836,54.212
  rectangle net NetC4_1: 8.817,53.569 11.78,54.212
  rectangle net GAIN_OUT#: 8.817,52.342 10.367,52.942
  rectangle net GAIN_OUT#: 9.463,49.059 10.352,52.942
  rectangle net GAIN_OUT: -0.498,42.037 1.351,42.989
  rectangle net GAIN_OUT: 6.471,47.103 9.071,48.703
  rectangle net 1/2VCC(2): 3.417,56.152 4.967,56.956
  rectangle net 1/2VCC: -0.801,49.148 2.628,49.935
  rectangle net VCC: 1.739,52.342 4.967,52.942
  pour cut-out: 7.823,66.192 7.823,62.457 4.693,62.457 4.694,66.192
Bottom Layer:
  rectangle net NetC16_2: 44.58,50.102 46.812,51.257
  pour cut-out: 7.823,66.192 7.823,62.457 4.693,62.457 4.694,66.192

## Silkscreen, mask and mechanical layers (free items; w line width, h text height)
Top Overlay:
  lines w0.127: 36.346,63.893 37.026,63.893 ; 42.885,63.892 43.966,63.892
  lines w0.203: 10.185,60.681 10.185,60.96 ; 47.371,54.788 47.371,55.169
  text "G" at 36.754,62.313 h1.4
  text "3B" at 39.221,62.313 h1.4
  text "N" at 41.834,62.313 h1.4
  text "3V3" at 1.245,60.047 h1.52 r90
  text "Q" at 43.496,59.068 h1.4
  text "BASS" at 13.892,54.496 h1.78
  text "MID" at 20.573,54.496 h1.78
  text "TREBLE" at 27.022,54.496 h1.65
  text "GND" at 1.245,51.764 h1.52 r90
  text "GAIN" at 12.269,44.475 h1.4
Bottom Overlay:
  drawing of 3075 lines, arcs and shapes, not listed
  text "ZERO CARBON FOOTPRINT" at 34.543,28.193 h0.97
Board Outline:
  the board outline again, w0.254
Fabrication:
  drawing of 373 lines, arcs and shapes, not listed
  text "Layer" at 57.889,67.996 h1.52
  text "Name" at 68.301,67.996 h1.52
  text "Material" at 91.916,67.996 h1.52
  text "Thickness" at 113.754,67.996 h1.52
  text "Constant" at 130.26,67.996 h1.52
  text "Board Layer Stack" at 144.734,67.996 h1.52
  text "Top Overlay" at 68.301,64.948 h1.52
  text "Top Solder" at 68.301,61.9 h1.52
  text "Solder Resist" at 91.916,61.9 h1.52
  text "3.00mil" at 113.754,61.9 h1.52
  text "3.5" at 130.26,61.9 h1.52
  text "1" at 57.889,58.852 h1.52
  text "Top Layer" at 68.301,58.852 h1.52
  text "10.00mil" at 113.754,58.852 h1.52
  text "Dielectric 1" at 68.301,55.804 h1.52
  text "FR-4" at 91.916,55.804 h1.52
  text "37.00mil" at 113.754,55.804 h1.52
  text "4.8" at 130.26,55.804 h1.52
  text "2" at 57.889,52.756 h1.52
  text "Bottom Layer" at 68.301,52.756 h1.52
  text "10.00mil" at 113.754,52.756 h1.52
  text "Bottom Solder" at 68.301,49.708 h1.52
  text "Solder Resist" at 91.916,49.708 h1.52
  text "3.00mil" at 113.754,49.708 h1.52
  text "3.5" at 130.26,49.708 h1.52
  text "Bottom Overlay" at 68.301,46.66 h1.52
Drill Drawing:
  circle w0.254: c0.067,80.082 r0.847
  lines w0.254: -0.78,83.469 -0.357,83.469 0.067,83.045 0.49,83.469 0.913,83.469 0.49,83.892 0.913,84.315 0.49,84.315 0.067,84.739 -0.357,84.315 -0.78,84.315 -0.357,83.892 -0.78,83.469 ; -0.78,86.855 0.913,86.855 0.913,88.549 -0.78,88.549 -0.78,86.855 ; -0.78,92.359 0.913,92.359 0.067,90.665 -0.78,92.359
  lines w0.381: -2.299,78.092 324.457,78.092 ; -2.299,93.332 324.457,93.332 ; 11.694,74.282 11.694,97.142 ; 25.406,74.282 25.406,97.142 ; 53.338,74.282 53.338,97.142 ; 66.187,74.282 66.187,97.142 ; 84.826,74.282 84.826,97.142 ; 122.914,74.282 122.914,97.142 ; 137.896,74.282 137.896,97.142 ; 156.84,74.282 156.84,97.142 ; 177.408,74.282 177.408,97.142 ; 199.094,74.282 199.094,97.142 ; 232.967,74.282 232.967,97.142 ; 266.841,74.282 266.841,97.142 ; 288.831,74.282 288.831,97.142 ; -2.299,74.282 324.457,74.282 324.457,97.142 -2.299,97.142 -2.299,74.282
  text "Symbol" at -0.013,94.475 h1.83
  text "Count" at 12.837,94.475 h1.83
  text "Hole Size" at 26.549,94.475 h1.83
  text "Plated" at 54.481,94.475 h1.83
  text "Hole Type" at 67.33,94.475 h1.83
  text "Drill Layer Pair" at 85.969,94.475 h1.83
  text "Via/Pad" at 124.057,94.475 h1.83
  text "Pad Shape" at 139.039,94.475 h1.83
  text "Template" at 157.983,94.475 h1.83
  text "Description" at 178.551,94.475 h1.83
  text "Hole Tolerance (+)" at 200.237,94.475 h1.83
  text "Hole Tolerance (-)" at 234.11,94.475 h1.83
  text "Hole Length" at 267.984,94.475 h1.83
  text "Routed Path Length" at 289.974,94.475 h1.83
  text "4" at 12.837,90.665 h1.52
  text "78.74mil (2.000mm)" at 26.549,90.665 h1.52
  text "PTH" at 54.481,90.665 h1.52
  text "Round" at 67.33,90.665 h1.52
  text "Top Layer - Bottom Layer" at 85.969,90.665 h1.52
  text "Pad" at 124.057,90.665 h1.52
  text "Rounded" at 139.039,90.665 h1.52
  text "c250h200m255" at 157.983,90.665 h1.52
  text "-" at 267.984,90.665 h1.52
  text "-" at 289.974,90.665 h1.52
  text "5" at 12.837,86.855 h1.52
  text "35.43mil (0.900mm)" at 26.549,86.855 h1.52
  text "PTH" at 54.481,86.855 h1.52
  text "Round" at 67.33,86.855 h1.52
  text "Top Layer - Bottom Layer" at 85.969,86.855 h1.52
  text "Pad" at 124.057,86.855 h1.52
  text "(Mixed)" at 139.039,86.855 h1.52
  text "(Mixed)" at 157.983,86.855 h1.52
  text "-" at 267.984,86.855 h1.52
  text "-" at 289.974,86.855 h1.52
  text "9" at 12.837,83.045 h1.52
  text "31.50mil (0.800mm)" at 26.549,83.045 h1.52
  text "PTH" at 54.481,83.045 h1.52
  text "Round" at 67.33,83.045 h1.52
  text "Top Layer - Bottom Layer" at 85.969,83.045 h1.52
  text "Pad" at 124.057,83.045 h1.52
  text "(Mixed)" at 139.039,83.045 h1.52
  text "(Mixed)" at 157.983,83.045 h1.52
  text "-" at 267.984,83.045 h1.52
  text "-" at 289.974,83.045 h1.52
  text "44" at 12.837,79.235 h1.52
  text "11.81mil (0.300mm)" at 26.549,79.235 h1.52
  text "PTH" at 54.481,79.235 h1.52
  text "Round" at 67.33,79.235 h1.52
  text "Top Layer - Bottom Layer" at 85.969,79.235 h1.52
  text "Via" at 124.057,79.235 h1.52
  text "Rounded" at 139.039,79.235 h1.52
  text "v60h30m0mx0" at 157.983,79.235 h1.52
  text "-" at 267.984,79.235 h1.52
  text "-" at 289.974,79.235 h1.52
  text "62 Total" at 12.837,75.425 h1.52

## Dimensions
0,65.072 to -1.5,66.572 on Dimensions
48.5,-1.5 to 47,0 on Dimensions
48.5,66.572 to 48.5,-1.5 on Dimensions
-1.5,66.572 to 48.5,66.572 on Dimensions